# Altium PCB OFS-BOARD.PcbDoc (part 1 of 2)
Units mm, origin at the board's own origin, x right, y up, seen from the top; angles counter-clockwise.
Board outline 131.85 x 70.25 mm, 4 copper layers (Top Layer, Power, GND, Bottom Layer), stack 0.603 mm thick; 110 components, 67 nets, 411 pads, 420 vias.
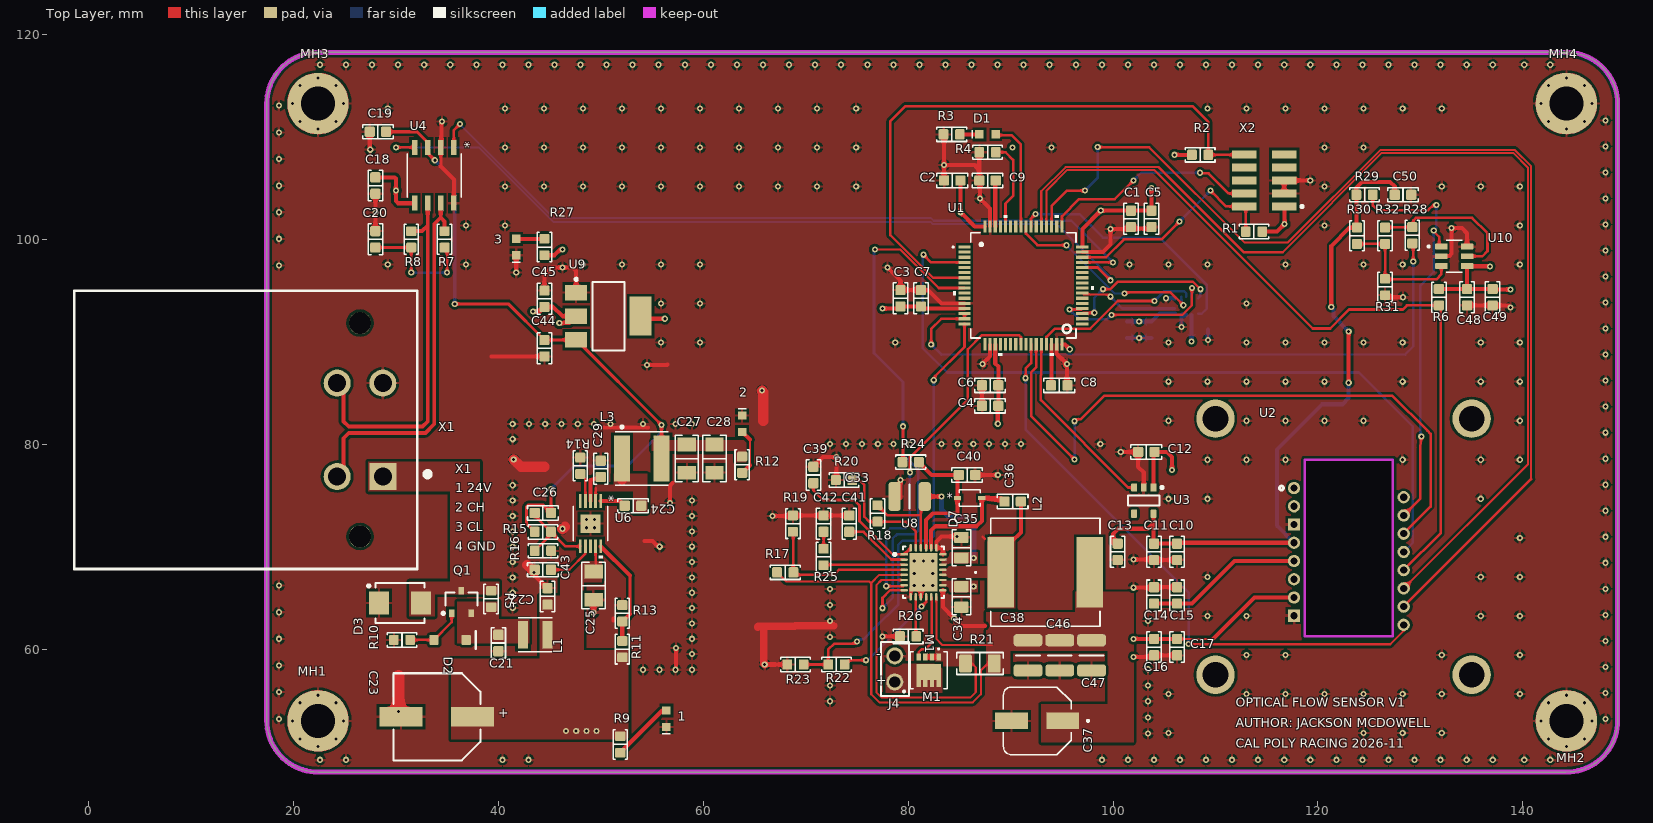
[diagram p0: Top Layer view]
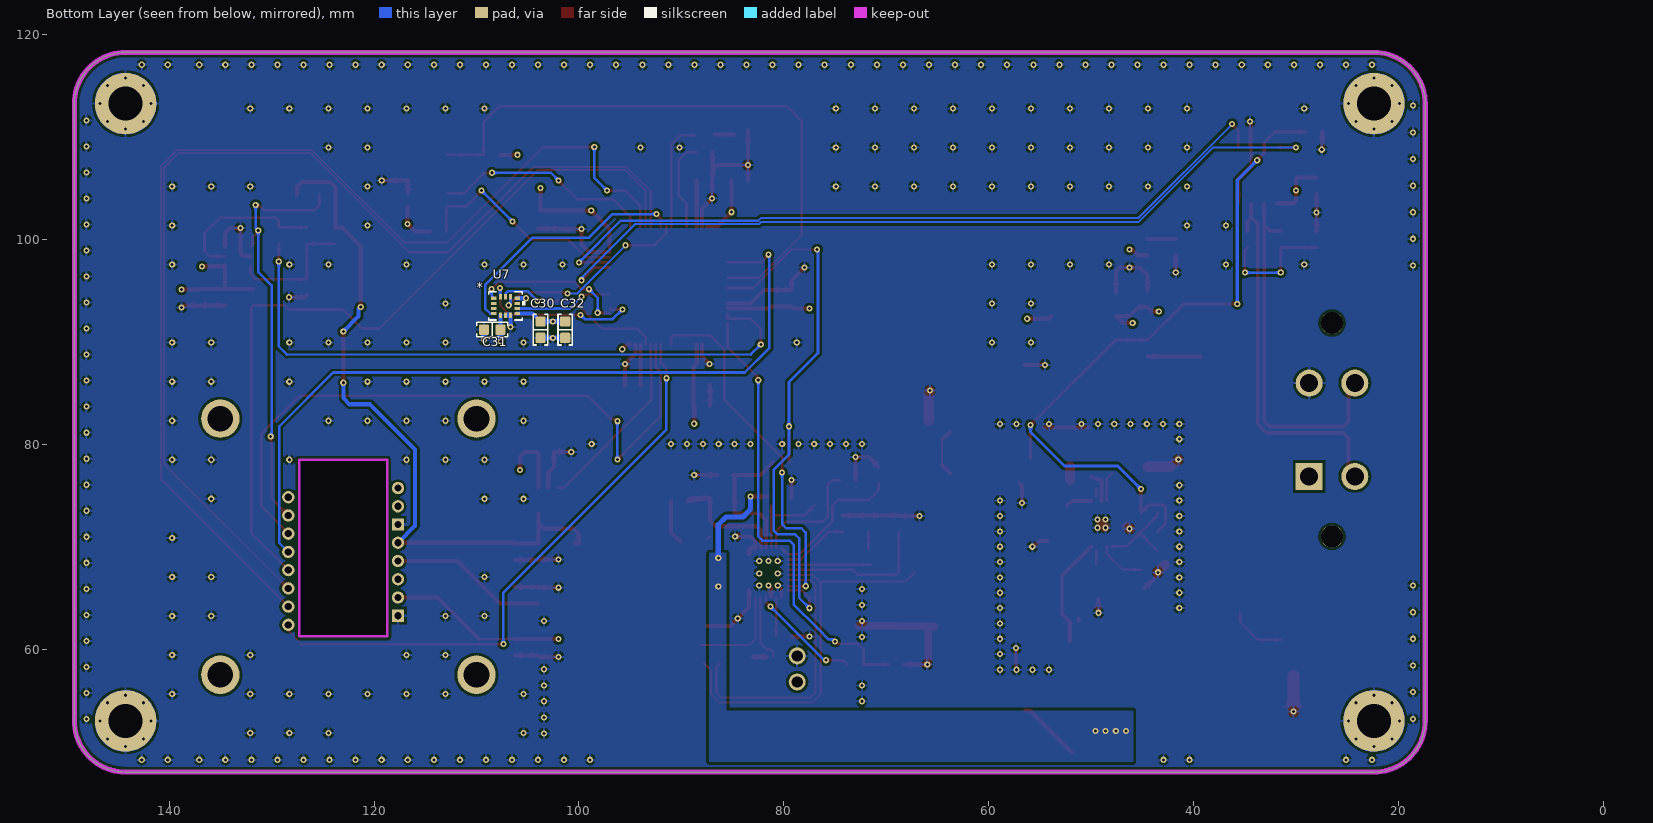
[diagram p1: Bottom Layer view, seen from below]
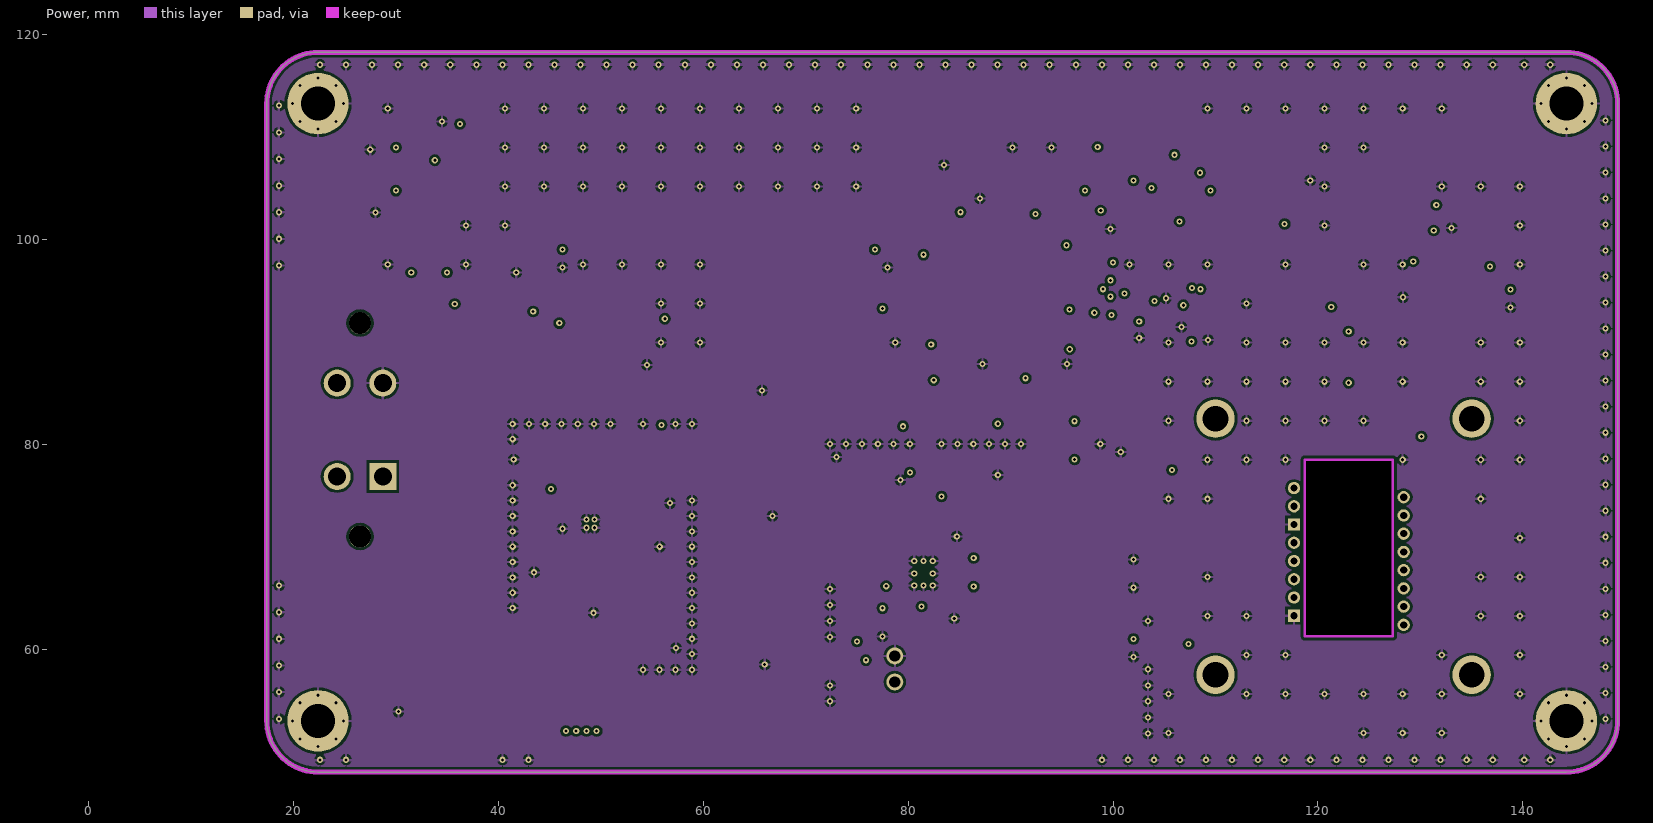
[diagram p2: Power]
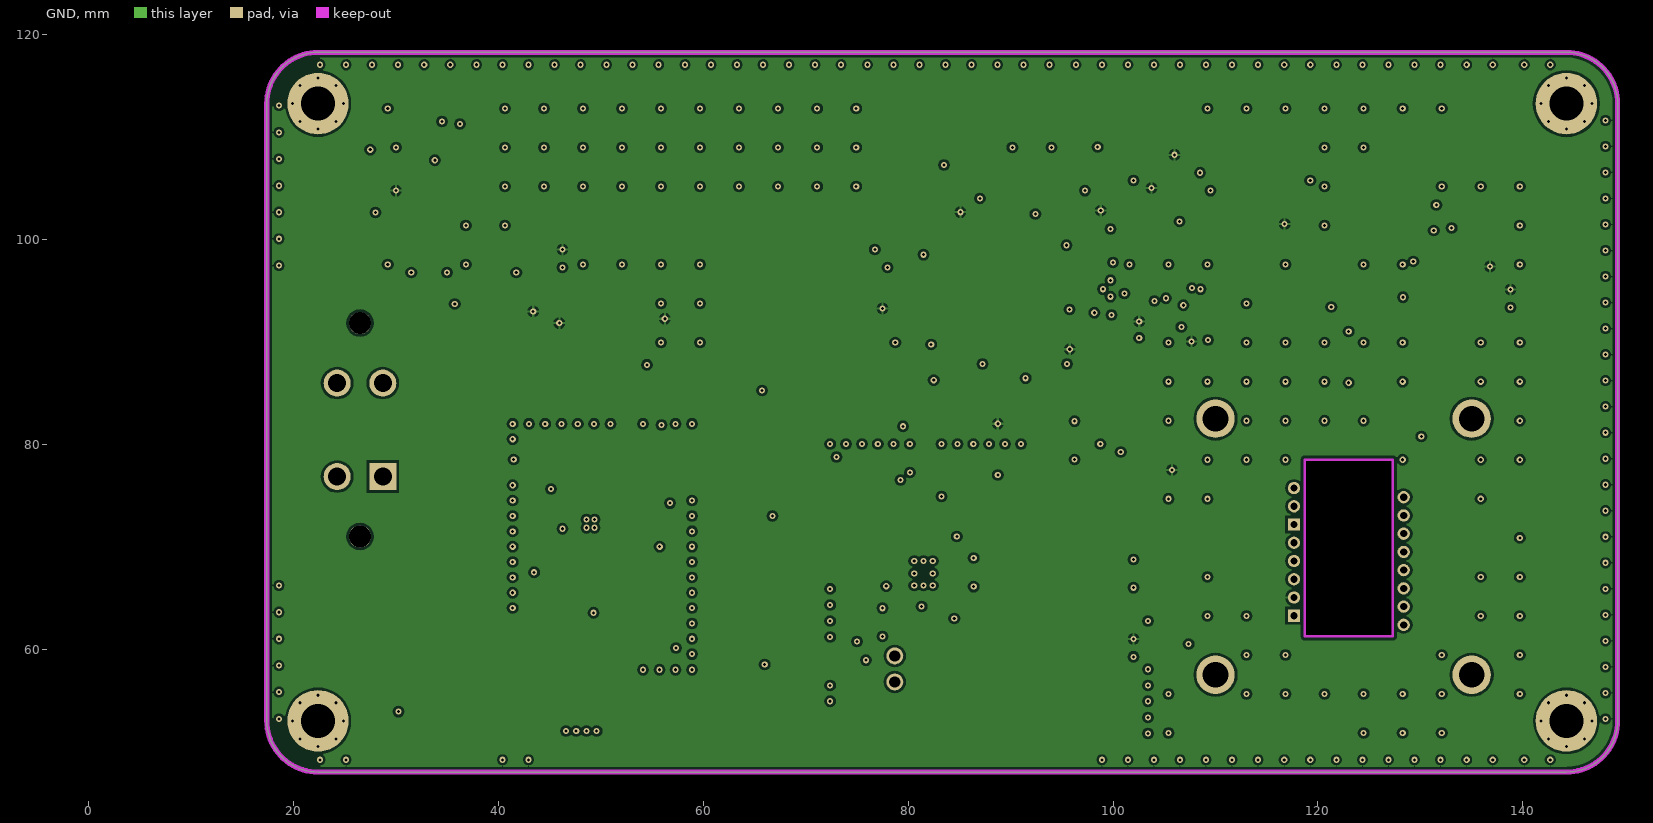
[diagram p3: GND]
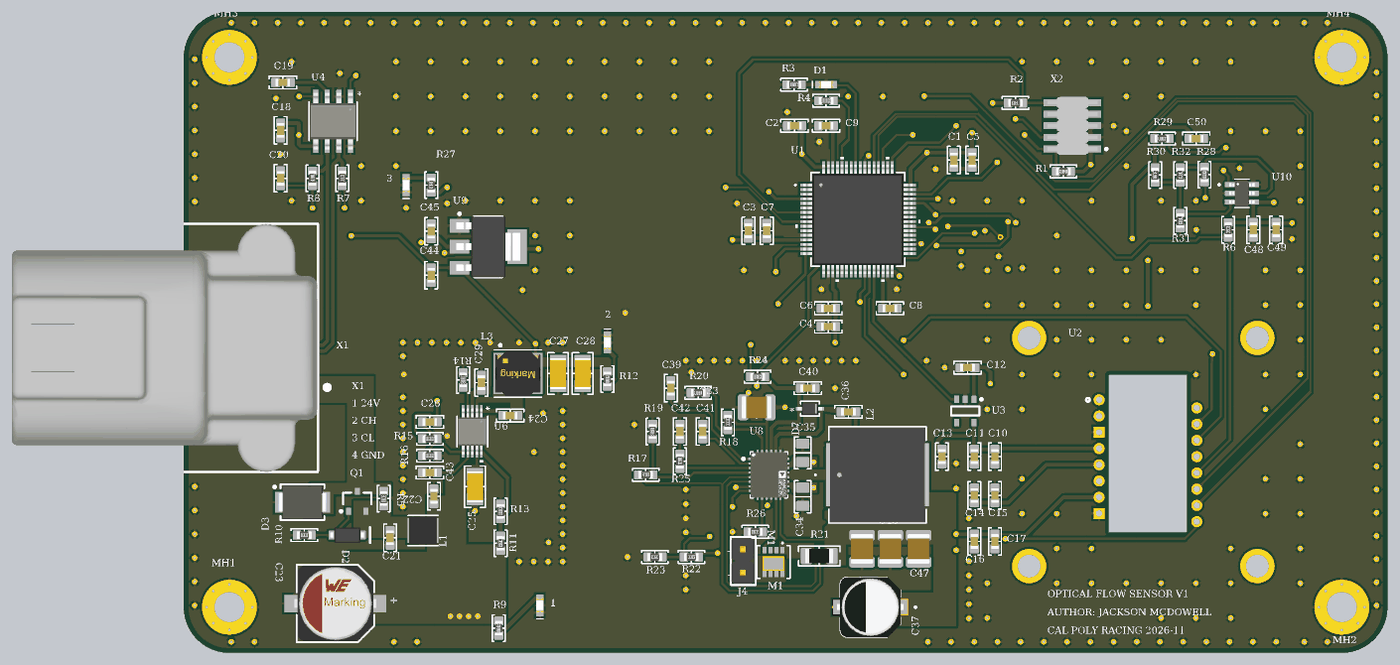
[diagram p4: 3D render of the assembled board from above, using the file's embedded part models]
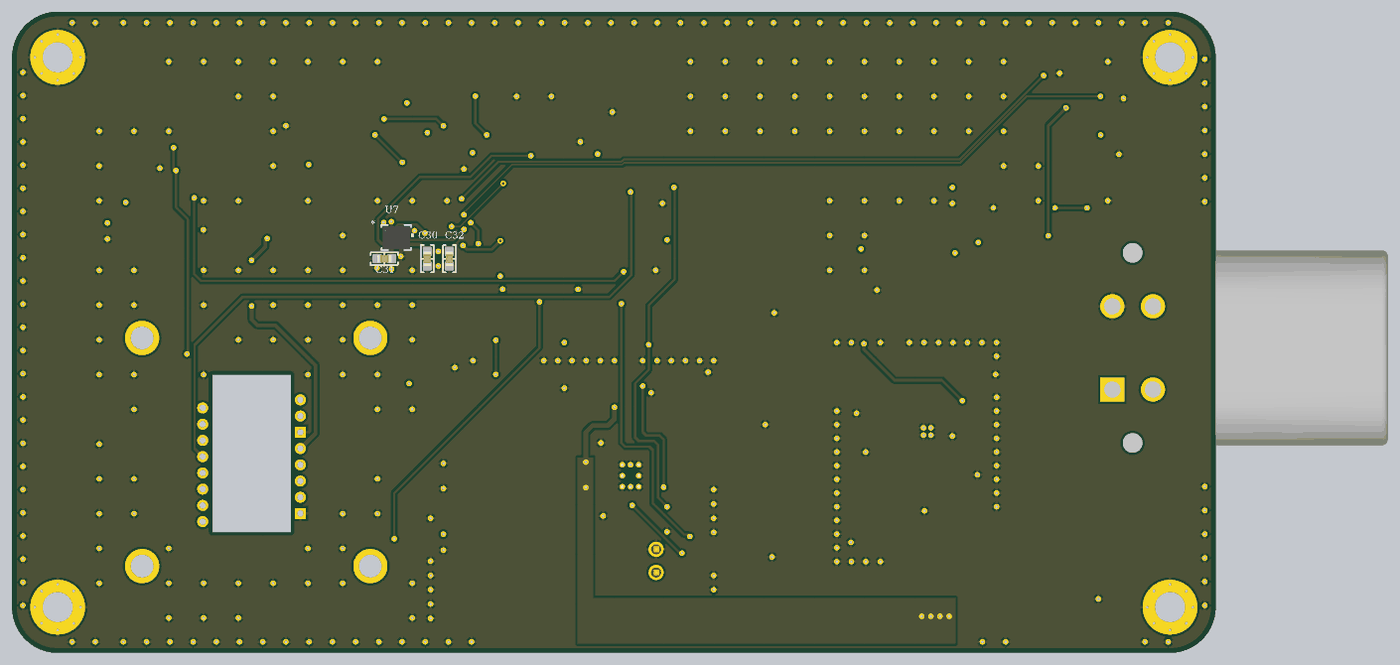
[diagram p5: 3D render of the assembled board from below, using the file's embedded part models]

## Layer stack, top to bottom
Top Solder: solder mask 0.0102, Solder Resist, Dk 3.5
Top Layer: signal copper 0.0356
Dielectric 2: prepreg 0.0711, PP-006, Dk 4.1
Power: signal copper 0.035
Dielectric 1: dielectric 0.32, FR-4, Dk 4.8
GND: signal copper 0.035
Dielectric 3: prepreg 0.0711, PP-006, Dk 4.1
Bottom Layer: signal copper 0.0356
Bottom Solder: solder mask 0.0102, Solder Resist, Dk 3.5

## Board outline
22.4,48 144.25,48 ccw(c144.25,53) 149.25,53 149.25,113.25 ccw(c144.25,113.25) 144.25,118.25 22.4,118.25 ccw(c22.4,113.25) 17.4,113.25 17.4,53 ccw(c22.4,53)
cut-out: 127.3,61.2 118.7,61.2 118.7,78.5 127.3,78.5

## Design rules (kind name [scope] priority, off if disabled: settings)
Clearance PourClearance [InPolygon] p1: gap=0.254 ignorepadtopadclearanceinfootprint=FALSE
Clearance [All] p2: gap=0.1 ignorepadtopadclearanceinfootprint=FALSE
DiffPairsRouting [All] p1: maxlimit=0.254 minlimit=0.254 mostfreqgap=0.254 toplayer_minwidth=0.381 toplayer_maxwidth=0.381 toplayer_prefwidth=0.381 midlayer1_minwidth=0.381 midlayer1_maxwidth=0.381 midlayer1_prefwidth=0.381 midlayer2_minwidth=0.381 midlayer2_maxwidth=0.381 midlayer2_prefwidth=0.381 bottomlayer_minwidth=0.381 bottomlayer_maxwidth=0.381 bottomlayer_prefwidth=0.381 maxuncoupledlength=12.7
HoleSize [All] p1: absolutevalues=TRUE maxlimit=3.5 minlimit=0.025 maxpercent=80.000 minpercent=20.000
PolygonConnect PowerPolyDirect [InNet('24V') Or InNet('24V_HARNESS') Or InNet('24V_Unfiltered') Or InNet('5V') Or InNet('SW') Or InNet('LED_SW') Or InNet('LED_VOUT') Or InNet('LED_ISN') Or InNet('LED_VCC')] p1: connectstyle=Direct reliefconductorwidth=0.254 reliefentries=4 polygonreliefangle="90 Angle" airgapwidth=0.254
PolygonConnect [All] p2: connectstyle=Relief reliefconductorwidth=0.254 reliefentries=4 polygonreliefangle="90 Angle" airgapwidth=0.254
RoutingVias [All] p1: holewidth=0.3 width=0.6 viastyle="Through Hole" minholewidth=0.3 minwidth=0.6 maxholewidth=0.3 maxwidth=0.6
SolderMaskExpansion [All] p1: expansion=0 istentingtop=FALSE
SupplyNets "Schematic Supply Nets_6" [InNet('3V3')] p1: voltage=0.000
SupplyNets "Schematic Supply Nets_5" [InNet('GND')] p2: voltage=0.000
SupplyNets "Schematic Supply Nets_4" [InNet('5V')] p3: voltage=0.000
SupplyNets "Schematic Supply Nets_3" [InNet('LED_VCC')] p4: voltage=0.000
SupplyNets "Schematic Supply Nets_2" [InNet('1.9V')] p5: voltage=0.000
SupplyNets "Schematic Supply Nets_1" [InNet('24V')] p6: voltage=0.000
SupplyNets "Schematic Supply Nets" [InNet('INTVCC_LED')] p7: voltage=0.000
Width 24V [InNetClass('All Nets')] p1: maxlimit=1.15 minlimit=0.1 preferedwidth=1.15 midlayer1_minwidth=0.254 midlayer1_maxwidth=0.254 midlayer1_prefwidth=0.254 midlayer2_minwidth=0.254 midlayer2_maxwidth=0.254 midlayer2_prefwidth=0.254 minimp=50.000000 maximp=50.000000 favimp=50.000000
Width [All] p2: maxlimit=0.254 minlimit=0.254 preferedwidth=0.254
28 further rules are at their usual default settings.

## Classes and differential pairs
component class U_POWER: 1 2 3 C21 C22 C23 C24 C25 C26 C27 C28 C29 C43 C44 C45 D2 D3 L1 L3 Q1 R5 R9 R10 R11 R12 R13 R14 R15 R16 R27 U6 U9
component class U_OFS: C10 C11 C12 C13 C14 C15 C16 C17 C48 C49 C50 R6 R28 R29 R30 R31 R32 U2 U3 U10
component class U_MCU: C1 C2 C3 C4 C5 C6 C7 C8 C9 D1 R1 R2 R3 R4 U1 X2
component class U_LED-DRIVER: C33 C34 C35 C36 C37 C38 C39 C40 C41 C42 C46 C47 D7 J4 L2 M1 R17 R18 R19 R20 R21 R22 R23 R24 R25 R26 U8
component class U_IMU: C30 C31 C32 U7
component class U_CAN_TRANSCEIVER: C18 C19 C20 R7 R8 U4
component class TOP-LEVEL: MH1 MH2 MH3 MH4 X1
differential pair CRIT_CAN: +CRIT_CAN_H -CRIT_CAN_L

## Components (designator, comment, footprint, x,y, rotation, side; value= is the part's Value field where it differs from the comment)
1 "0603_LED" 0603_LED 56.4,53.2 r90 top
2 "0603_LED" 0603_LED 63.8,82 r270 top
3 "0603_LED" 0603_LED 41.75,99.25 r90 top
C1 "Capacitor" 0603_CAP 101.75,102 r270 top value=4.7u
C2 "Capacitor" 0603_CAP 84.3,105.75 r180 top value=100n
C3 "Capacitor" 0603_CAP 79.25,94.25 r90 top value=100n
C4 "Capacitor" 0603_CAP 88,83.75 r180 top value=100n
C5 "Capacitor" 0603_CAP 103.75,102 r270 top value=100n
C6 "Capacitor" 0603_CAP 88,85.75 r180 top value=100n
C7 "Capacitor" 0603_CAP 81.25,94.25 r90 top value=100n
C8 "Capacitor" 0603_CAP 94.75,85.75 r0 top value=2.2u
C9 "Capacitor" 0603_CAP 87.75,105.75 r180 top value=2.2u
C10 "Capacitor" 0603_CAP 106.25,69.5 r90 top value=100n
C11 "Capacitor" 0603_CAP 104,69.5 r90 top value=10u
C12 "Capacitor" 0603_CAP 103.25,79.25 r0 top value=1u
C13 "Capacitor" 0603_CAP 100.45,69.5 r90 top value=1u
C14 "Capacitor" 0603_CAP 104,65.25 r270 top value=4.7u
C15 "Capacitor" 0603_CAP 106.25,65.25 r270 top value=100n
C16 "Capacitor" 0603_CAP 104,60.2 r90 top value=10u
C17 "Capacitor" 0603_CAP 106.25,60.2 r90 top value=100n
C18 "Capacitor" 0603_CAP 28,105.25 r90 top value=100n
C19 "Capacitor" 0603_CAP 28.25,110.5 r0 top value=100n
C20 "Capacitor" 0603_CAP 28,100 r90 top value=4.7n
C21 "Capacitor" 0603_CAP 40,60.6 r90 top value=10u
C22 "Capacitor" 0603_CAP 44.8,65.15 r270 top value=10u
C23 "100u" WCAP-PSHP_D8H8.7 34,53.4 r0 top
C24 "Capacitor" 0603_CAP 53.15,74 r180 top value=100n
C25 "GRM319R61H475KA12D" 1206_CAP 49.3,66.2 r90 top
C26 "Capacitor" 0603_CAP 44.35,73.3 r0 top value=10p
C27 "GRM319R61C226KE15D" 1206_CAP 58.4,78.6 r90 top
C28 "GRM319R61C226KE15D" 1206_CAP 61.1,78.6 r90 top
C29 "Capacitor" 0603_CAP 50,77.6 r270 top value=1u
C30 "Capacitor" 0603_CAP 103.759,91.186 r90 bottom value=100nF
C31 "Capacitor" 0603_CAP 108.466,91.186 r180 bottom value=10nF
C32 "Capacitor" 0603_CAP 101.346,91.186 r90 bottom value=2.2uF
C33 "Capacitor" 1210_CAP 80.15,74.9 r180 top value=10µF
C34 "Capacitor" 0805_CAP 85.19,65.1 r270 top value=1µF
C35 "Capacitor" 0805_CAP 85.19,69.9 r90 top value=1µF
C36 "Capacitor" 0603_CAP 90.2,74.4 r0 top value=22nF
C37 "Capacitor" CAP_EEH-ZC1E101XP 92.6,53 r180 top value=100µF
C38 "Capacitor" 1210_CAP 91.7,59.4 r270 top value=4.7µF
C39 "Capacitor" 0603_CAP 70.75,77 r90 top value=2.2µF
C40 "Capacitor" 0603_CAP 85.75,77 r0 top value=2.2µF
C41 "Capacitor" 0603_CAP 74.25,72.25 r90 top value=100nF
C42 "Capacitor" 0603_CAP 71.75,72.25 r90 top value=10nF
C43 "Capacitor" 0603_CAP 44.35,67.75 r0 top value=1n
C44 "Capacitor" 0603_CAP 44.5,89.375 r90 top value=10u
C45 "Capacitor" 0603_CAP 44.5,94.2 r270 top value=22u
C46 "Capacitor" 1210_CAP 94.8,59.4 r270 top value=XµF
C47 "Capacitor" 1210_CAP 97.9,59.4 r270 top value=XµF
C48 "Capacitor" 0603_CAP 134.55,94.35 r90 top value=100n
C49 "Capacitor" 0603_CAP 137.05,94.35 r90 top value=2.2u
C50 "Capacitor" 0603_CAP 128.3,104.35 r180 top value=100n
D1 "0603_LED" 0603_LED 87.75,110.25 r0 top
D2 "MMSZ5231B-7-F" SOD-123 35.3,60.9 r180 top
D3 "SMBJ26CA" SMBJ26CA 30.4,64.5 r0 top
D7 "BAT46WJ,115" SC-90_SOD323F_NEX 86,74.75 r0 top
J4 "1x2PinHeader" 1x2PinHeader 78.7,58.07 r90 top
L1 "100uH" WE-LQS_3015 43.6,61.4 r0 top
L2 "Inductor" IND_SRP1038WA-6R8M_BRN 93.39,67.5 r0 top value=12µH
L3 "74404054150" 74404054150 54,78.6 r180 top
M1 "DMP3045LFVWQ-7" PowerDI3333-8_PMOS 82,57.95 r270 top
MH1 "MOUNTING_HOLE" MOUNTING_HOLE 22.4,53 r0 top
MH2 "MOUNTING_HOLE" MOUNTING_HOLE 144.25,53 r0 top
MH3 "MOUNTING_HOLE" MOUNTING_HOLE 22.4,113.25 r0 top
MH4 "MOUNTING_HOLE" MOUNTING_HOLE 144.25,113.25 r0 top
Q1 "GSFC0403" SSM3J351R,LF 36.4,64.6 r90 top
R1 "Resistor" 0603_RES 113.75,100.75 r180 top value=10k
R2 "Resistor" 0603_RES 108.5,108.25 r180 top value=10k
R3 "Resistor" 0603_RES 84.25,110.25 r0 top value=1k
R4 "Resistor" 0603_RES 87.75,108.5 r0 top value=10k
R5 "Resistor" 0603_RES 39.3,64.9 r90 top value=DNP
R6 "Resistor" 0603_RES 131.8,94.35 r90 top value=10k
R7 "Resistor" 0603_RES 34.75,100 r90 top value=62
R8 "Resistor" 0603_RES 31.5,100 r270 top value=62
R9 "Resistor" 0603_RES 51.9,50.7 r90 top value=16k
R10 "Resistor" 0603_RES 30.6,60.9 r0 top value=100k
R11 "Resistor" 0603_RES 52.1,60 r270 top value=140K
R12 "Resistor" 0603_RES 63.8,78 r90 top value=2.4k
R13 "Resistor" 0603_RES 52.1,63.5 r270 top value=10K
R14 "Resistor" 0603_RES 48,77.9 r270 top value=86.6k
R15 "Resistor" 0603_RES 44.35,71.45 r0 top value=1M
R16 "Resistor" 0603_RES 44.35,69.6 r0 top value=187k
R17 "Resistor" 0603_RES 68,67.5 r180 top value=150k
R18 "Resistor" 0603_RES 77,73.25 r90 top value=274K
R19 "Resistor" 0603_RES 68.75,72.25 r270 top value=10k
R20 "Resistor" 0603_RES 73.75,76.5 r180 top value=29.4k
R21 "Resistor" 1206_RES 87,58.6 r0 top value=60mΩ
R22 "Resistor" 0603_RES 73,58.5 r0 top value="33 Ω"
R23 "Resistor" 0603_RES 69,58.5 r180 top value=100k
R24 "Resistor" 0603_RES 80.25,78.25 r0 top value=100K
R25 "Resistor" 0603_RES 71.75,69 r270 top value=162k
R26 "Resistor" 0603_RES 80,61.25 r0 top value=45.3k
R27 "Resistor" 0603_RES 44.5,99.25 r270 top value=820
R28 "Resistor" 0603_RES 129.207,100.4 r90 top value=33Ω
R29 "Resistor" 0603_RES 124.55,104.35 r0 top value=1k
R30 "Resistor" 0603_RES 123.8,100.35 r90 top value=10k
R31 "Resistor" 0603_RES 126.55,95.35 r270 top value=53.6k
R32 "Resistor" 0603_RES 126.55,100.35 r270 top value=560k
U1 "STM32H573RIT6" LQFP64-10x10mm_STM 91.25,95.5 r0 top
U2 "PAW3395DM-T6QU" PAW3395DM-T6QU 123,69.5 r0 top
U3 "TLV70019DDCR" DDC0005A_L 103,74.5 r270 top
U4 "TCAN1057AVDRQ1" SOIC8_D_TEX 33.75,106.25 r270 top
U6 "LT8609AHMSE#TRPBF" 05-08-1664_ADI 49,72.25 r270 top
U7 "ICM-42688-P" LGA14_2P5X3X0P91_TDK 107.165,93.5 r180 bottom
U8 "LT3932EUFD-1#PBF" FP-UFD-28-05-08-1712-IPC_C 81.5,67.5 r0 top
U9 "AZ1117CH-3.3TRG1" SOT-233-4 50.75,92.5 r0 top
U10 "TLV3501AIDBVR" SOT95P280X145-6N 133.3,98.35 r0 top
X1 "DTF13-4P" DTF13-4P 26.5,81.41 r270 top
X2 "20021121-00010C4LF" HDR2X5_SMT 114.75,105.75 r90 top

## Footprints (in the part's own frame and the unit in brackets; to place one, negate y for a bottom-side part, rotate by r counter-clockwise, add the part's x,y. Pads: shape width x height; smd on the part's side, far side on the other; paste and mask are expansions set on the pad)
1x2PinHeader [mm]
  round 1.65 hole 1.1 mask+0: 1(-1.27,0) 2(1.27,0)
  silkscreen extent -2.64,-1.37 2.64,1.37, body extent -2.54,-1.22 2.54,1.32, height 8.77
05-08-1664_ADI [mil]
  rect 52.5x11 smd paste+0 mask+0: 1(-87.25,39.37) 2(-87.25,19.68) 3(-87.25,0) 4(-87.25,-19.69) 5(-87.25,-39.37) 6(87.25,-39.37) 7(87.25,-19.69) 8(87.25,0) 9(87.25,19.68) 10(87.25,39.37)
  rect 70x78 smd paste+0 mask+0: 11(0,0)
  silkscreen extent -66,-66 134,66, body extent -99,-61 99,61, height 43
0603_CAP [mm]
  rrect25% 1x1 smd: 1(-0.8,0) 2(0.8,0)
  silkscreen extent -1.5,-0.7 1.5,0.7, body extent -0.8,-0.41 0.8,0.41, height 0.82
0603_LED [mm] "SMD Mono-color Chip LED, body 1.60 x 0.80 mm"
  rect 0.8x0.8 smd: 1(-0.8,0) 2(0.8,0)
  silkscreen extent -1.55,-0.4 -1.4,0.4, body extent -0.8,-0.4 0.8,0.4, height 0.7
0603_RES [mm] "Chip Resistor, 2-Leads, Body 1.60x0.80mm, IPC Medium Density"
  rrect25% 0.95x1 smd: 1(-0.8,0) 2(0.8,0)
  silkscreen extent -1.45,-0.7 1.45,0.7, body extent -0.8,-0.4 0.8,0.4, height 0.45
0805_CAP [mm] "Chip Capacitor, Body 3.2x1.6mm, Height 1.9mm, IPC Low Density"
  rrect25% 1.1x1.45 smd: 1(-1,0) 2(1,0)
  silkscreen extent -1.75,-0.9 1.75,0.9, body extent -1.1,-0.65 1.1,0.65, height 1.1
1206_CAP [mm]
  rect 1.35x1.8 smd: 1(-1.375,0) 2(1.375,0)
  silkscreen extent -2.27,-1.12 2.27,1.15, body extent -1.7,-0.87 1.7,0.87, height 0.95
1206_RES [mm]
  rrect25% 1.25x1.75 smd: 1(-1.4,0) 2(1.4,0)
  silkscreen extent -2.27,-1.07 2.27,1.07, body extent -1.55,-0.77 1.55,0.78, height 0.55
1210_CAP [mm]
  rrect50% 1.18x2.82 smd: 1(-1.47,0) 2(1.47,0)
  silkscreen extent 0,-1.15 0,1.15, body extent -1.65,-1.25 1.65,1.25, height 0.94
74404054150 [mm] "SMD Power Inductor, 2-Leads, body 5x5mm"
  rect 1.55x4.5 smd: 1(1.925,0) 2(-1.925,0)
  silkscreen extent -2.6,-3.22 2.6,2.6, body extent -2.5,-2.5 2.5,2.5, height 4.03
CAP_EEH-ZC1E101XP [mm]
  rect 3.2x1.6 smd paste+0 mask+0.102: 1(-2.5,0) 2(2.5,0)
  silkscreen extent -5.05,-3.3 3.3,3.3, body extent -3.65,-3.3 3.65,3.3, height 7.7
DDC0005A_L [mm] "SOT23, 5-Leads, Body 3.05x1.75mm, Pitch 0.95mm, IPC High Density"
  rrect18% 0.8x0.55 smd: 1(-1.275,0.95) 2(-1.275,0) 3(-1.275,-0.95) 4(1.275,-0.95) 5(1.275,0.95)
  silkscreen extent -1.4,-1.55 0.5,1.9, body extent -0.88,-1.52 0.87,1.53, height 1.1
DTF13-4P [mm]
  rect 2.64x2.64 hole 1.76: 1(4.561,2.223)
  round 2.64 hole 1.76: 2(4.561,-2.227) 3(-4.559,-2.227) 4(-4.559,2.223)
  round 2.16 hole 2.16 unplated: None(-10.415,0) None(10.415,0)
  silkscreen extent -13.59,-27.88 13.59,6.85, body extent -13.59,-27.94 13.59,5.52, height 23.53
FP-UFD-28-05-08-1712-IPC_C [mm]
  rect 0.731x0.242 smd paste+0 mask+0: 1(-1.891,1.75)
  rrect100% 0.731x0.242 smd paste+0 mask+0: 2(-1.891,1.25) 3(-1.891,0.75) 4(-1.891,0.25) 5(-1.891,-0.25) 6(-1.891,-0.75) 7(-1.891,-1.25) 8(-1.891,-1.75) 15(1.891,-1.75) 16(1.891,-1.25) 17(1.891,-0.75) 18(1.891,-0.25) 19(1.891,0.25) 20(1.891,0.75) 21(1.891,1.25) 22(1.891,1.75)
  rrect100% 0.242x0.731 smd paste+0 mask+0: 9(-1.25,-2.391) 10(-0.75,-2.391) 11(-0.25,-2.391) 12(0.25,-2.391) 13(0.75,-2.391) 14(1.25,-2.391) 23(1.25,2.391) 24(0.75,2.391) 25(0.25,2.391) 26(-0.25,2.391) 27(-0.75,2.391) 28(-1.25,2.391)
  rect 2.75x3.75 smd paste-1000 mask+0: 29(0,0)
  silkscreen extent -2.93,-2.5 2,2.5, body extent -2.36,-2.86 2.36,2.86, height 0.25
HDR2X5_SMT [mm] "Header, 10-Leads, Body 3.43x6.35mm, Pitch 1.27mm"
  rect 0.76x2.4 smd: 1(-2.54,-1.95) 2(-2.54,1.95) 3(-1.27,-1.95) 4(-1.27,1.95) 5(0,-1.95) 6(0,1.95) 7(1.27,-1.95) 8(1.27,1.95) 9(2.54,-1.95) 10(2.54,1.95)
  silkscreen extent -2.66,-3.83 -2.42,-3.58, body extent -3.17,-2.75 3.18,2.75, height 4.5
IND_SRP1038WA-6R8M_BRN [mil]
  rect 103x272 smd paste+0 mask+0: 1(-171,0) 2(171,0)
  silkscreen extent -271,-208 210,208, body extent -222,-203 222,203, height 158
LGA14_2P5X3X0P91_TDK [mil]
  rect 21x12 smd paste+0 mask+0: 1(-44.5,29.53) 2(-44.5,9.84) 3(-44.5,-9.84) 4(-44.5,-29.53) 8(44.5,-29.53) 9(44.5,-9.84) 10(44.5,9.84) 11(44.5,29.53)
  rect 12x21 smd paste+0 mask+0: 5(-19.68,-35) 6(0,-35) 7(19.69,-35) 12(19.69,35) 13(0,35) 14(-19.68,35)
  silkscreen extent -64,-54 75,54, body extent -59,-49 59,49, height 38
LQFP64-10x10mm_STM [mm]
  rect 1.194x0.305 smd paste+0 mask+0: 1(-5.75,3.75) 2(-5.75,3.25) 3(-5.75,2.75) 4(-5.75,2.25) 5(-5.75,1.75) 6(-5.75,1.25) 7(-5.75,0.75) 8(-5.75,0.25) 9(-5.75,-0.25) 10(-5.75,-0.75) 11(-5.75,-1.25) 12(-5.75,-1.75) 13(-5.75,-2.25) 14(-5.75,-2.75) 15(-5.75,-3.25) 16(-5.75,-3.75) 33(5.75,-3.75) 34(5.75,-3.25) 35(5.75,-2.75) 36(5.75,-2.25) 37(5.75,-1.75) 38(5.75,-1.25) 39(5.75,-0.75) 40(5.75,-0.25) 41(5.75,0.25) 42(5.75,0.75) 43(5.75,1.25) 44(5.75,1.75) 45(5.75,2.25) 46(5.75,2.75) 47(5.75,3.25) 48(5.75,3.75)
  rect 0.305x1.194 smd paste+0 mask+0: 17(-3.75,-5.75) 18(-3.25,-5.75) 19(-2.75,-5.75) 20(-2.25,-5.75) 21(-1.75,-5.75) 22(-1.25,-5.75) 23(-0.75,-5.75) 24(-0.25,-5.75) 25(0.25,-5.75) 26(0.75,-5.75) 27(1.25,-5.75) 28(1.75,-5.75) 29(2.25,-5.75) 30(2.75,-5.75) 31(3.25,-5.75) 32(3.75,-5.75) 49(3.75,5.75) 50(3.25,5.75) 51(2.75,5.75) 52(2.25,5.75) 53(1.75,5.75) 54(1.25,5.75) 55(0.75,5.75) 56(0.25,5.75) 57(-0.25,5.75) 58(-0.75,5.75) 59(-1.25,5.75) 60(-1.75,5.75) 61(-2.25,5.75) 62(-2.75,5.75) 63(-3.25,5.75) 64(-3.75,5.75)
  silkscreen extent -6.93,-6.85 6.85,6.85, body extent -6,-6 6,6, height 1.6
MOUNTING_HOLE [mm] "Mounting Hole for 4-40 Bolt2"
  round 0.6 hole 0.3: 1(-2.5,0) 1(-1.768,-1.768) 1(-1.768,1.768) 1(0,-2.5) 1(0,2.5) 1(1.768,-1.768) 1(1.768,1.768) 1(2.5,0)
  round 6 hole 3.3 unplated: 1(0,0)
  Top Layer circle w1: c0,0 r2.5
  Bottom Layer circle w1: c0,0 r2.5
PAW3395DM-T6QU [mm] "PixArt PAW3395DM-T6QU optical navigation sensor, 16-pin molded lead-frame DIP, 1.78mm pitch staggered dual row, 10.7mm row spacing, through-hole"
  round 1.2 hole 0.7: 1(-5.334,6.223) 2(-5.334,4.443) 4(-5.334,0.883) 5(-5.334,-0.897) 6(-5.334,-2.677) 7(-5.334,-4.457) 9(5.366,-7.127) 10(5.366,-5.347) 11(5.366,-3.567) 12(5.366,-1.787) 13(5.366,-0.007) 14(5.366,1.773) 15(5.366,3.553) 16(5.366,5.333)
  rect 1.2x1.2 hole 0.7: 3(-5.334,2.663) 8(-5.334,-6.237)
  Keep-Out Layer lines w0.254: -4.284,-8.257 4.316,-8.257 4.316,9.003 -4.284,9.003 -4.284,-8.257
  silkscreen extent -6.76,6.02 -6.36,6.42
PowerDI3333-8_PMOS [mm]
  rect 0.7x0.42 smd paste+0 mask+0: 1(-1.3,0.975) 1(-1.3,-0.325) 1(-1.3,0.325) 4(-1.3,-0.975) 5(1.3,0.975) 5(1.3,-0.325) 5(1.3,0.325) 5(1.3,-0.975)
  rect 1.549x2.37 smd paste-0.127 mask+0: 5(0.175,0)
  silkscreen extent -2.15,-1.8 1.8,1.8
SC-90_SOD323F_NEX [mil]
  rect 27.87x16 smd paste+0 mask+0: 1(-46.94,0) 2(46.94,0)
  silkscreen extent -40,-32 40,32, body extent -53,-26 53,26, height 32
SMBJ26CA [mm] "SODFL, 2-Leads, Body 3.62x5.40mm, IPC Medium Density"
  rect 1.95x2.25 smd: 1(-2.05,0) 2(2.05,0)
  silkscreen extent -3.17,-1.95 2.4,1.95, body extent -2.67,-1.81 2.67,1.81, height 2.65
SOD-123 [mm] "SODFL, 2-Leads, Body 1.55x3.70mm, IPC Medium Density"
  rrect15% 0.9x0.95 smd: 1(-1.575,0) 2(1.575,0)
  silkscreen extent -2.5,-0.85 -2.5,0.85, body extent -1.85,-0.85 1.85,0.85, height 1.35
SOIC8_D_TEX [mil]
  rect 57.5x22 smd paste+0 mask+0: 1(-107.25,75) 2(-107.25,25) 3(-107.25,-25) 4(-107.25,-75) 5(107.25,-75) 6(107.25,-25) 7(107.25,25) 8(107.25,75)
  silkscreen extent -84,-104 84,104, body extent -122,-99 122,99, height 69
SOT95P280X145-6N [mm]
  rrect25% 1.21x0.58 smd: 1(-1.255,0.95) 2(-1.255,0) 3(-1.255,-0.95) 4(1.255,-0.95) 5(1.255,0) 6(1.255,0.95)
  silkscreen extent -2.6,-1.56 0.8,1.56, body extent -1.4,-1.45 1.4,1.45, height 1.45
SOT-233-4 [mm] "SOT223, 4-Leads, Body 6.50x7.00mm (avg), Pitch 2.30mm, IPC Medium Density"
  rect 2.15x1.5 smd: 1(-3.15,2.3) 2(-3.15,0) 3(-3.15,-2.3)
  rect 2.15x3.8 smd: 4(3.15,0)
  silkscreen extent -3.27,-3.35 1.55,3.72, body extent -3.5,-3.35 3.5,3.35, height 1.8
SSM3J351R,LF [mm]
  rect 0.75x0.55 smd: 1(-1.1,0.95) 2(-1.1,-0.95) 3(1.1,0)
  silkscreen extent -1.22,-1.55 0.95,1.9, body extent -0.95,-1.55 0.95,1.55, height 0.81
WCAP-PSHP_D8H8.7 [mm] "Aluminium Polymer V-Chip SMT Capacitors, D8mm x L8.7mm"
  rect 4.2x1.9 smd: 1(3.5,0) 2(-3.5,0)
  silkscreen extent -4.25,-4.25 4.25,4.25, body extent -4.5,-4.15 4.5,4.15, height 8.7
WE-LQS_3015 [mm] "SMD Power Inductor, 2-Leads, body 3x3mm"
  rect 1x2.7 smd: 1(-1.2,0) 2(1.2,0)
  silkscreen extent -1.66,-1.66 1.66,1.66, body extent -1.5,-1.5 1.5,1.5, height 1.5

## Part data
1 2 3 D1: "WL-SMCW Mono-color Chip LED Waterclear, SMT, size 0603, Blue, 3.2V, 140°", Case/Size Code=0603, Emitting Color=Blue, Forward Voltage=3.2V, Manufacturer="Wurth Elektronik", Manufacturer Part Number=150060BS75000, Operating Temperature Max=85°C, Operating Temperature Min=-40°C, Category="Signal LEDs", Chip Technology=InGaN, ComponentLink1Description="Website Link", ComponentLink1URL=https://www.we-online.com/redexpert/article/150060BS75000?ad, ComponentLink2Description="Datasheet Link", ComponentLink2URL=https://www.we-online.com/redexpert/spec/150060BS75000?ad, Dominant Wavelength=470nm, Height=0.7mm, Length=1.6mm, Luminous Intensity=145mcd, Match Code=WL-SMCW, Mount="Surface Mount", Packaging="Tape and Reel", Peak Wavelength=465nm, Viewing Angle=140°, Width=0.8mm
C1 C2 C3 C4 C5 C6 C7 C8 C9 C18 C19 C20 C24 C26 C29 C43 C44 C45: Voltage=16V
C21 C22: Voltage=50V
C23: library part 875115652007, "Cap, 100uf, 35V, Alu Elec Smd, Polymer Rohs Compliant Wurth Elektronik 875115652007", Capacitance=100µF, ESR (Equivalent Series Resistance)=30mΩ, Leakage Current=700µA, Max Operating Temperature=105°C, Min Operating Temperature=-55°C, Ripple Current=3A, Voltage Rating=35V, ComponentLink1Description=Digikey, ComponentLink1URL=https://www.digikey.com/en/products/detail/würth-elektronik/875115652007/8556615, Diameter=8mm, Length=8.7mm, Pitch=3.1mm, RoHS=Compliant, Width=8.3mm
C25: "CAP CER 4.7UF 50V X5R 1206", Voltage=50V, ComponentLink1Description=Digikey, ComponentLink1URL=https://www.digikey.com/en/products/detail/murata-electronics/GRM319R61H475KA12D/6606013, Vaule=4.7u
C27 C28: "CAP CER 22UF 16V X5R 1206", Voltage=16V, ComponentLink1Description=Digikey, ComponentLink1URL=https://www.digikey.com/en/products/detail/murata-electronics/GRM319R61C226KE15D/8323879, Vaule=22u
D2: "Zener Diode 5.1V 500mW ±5% Surface Mount SOD-123", Package=SOD-123, ComponentLink1Description=Digikey, ComponentLink1URL=https://www.digikey.com/en/products/detail/diodes-incorporated/MMSZ5231B-7-F/755472, Num_Circuits=1
D3: "42.1V Clamp 14.3A Ipp Tvs Diode Surface Mount DO-214AA (SMBJ)", ComponentLink1Description=Digikey, ComponentLink1URL=https://www.digikey.com/en/products/detail/littelfuse-inc/SMBJ26CA/286000
D7: library part "Schottky Diode", "Schottky Diode", AF=1, BV=0, BV_MAX=1e99, CJO=0, CJP=0, CTA=0, CTP=0, EG=1.11, FC=0.5, FCS=0.5, FV_MAX=1e99, IBV=0.001, IKF=0, IKR=0, IS=1e-14, ISR=1e-14, JSW=0, JTUN=0, JTUNSW=0, KEG=1, KF=0, LEVEL=1, MJSW=0.33, N=1, NBV=1, NR=1, NS=1, NTUN=30, PHP=1, RS=0, SimulationGenericComponent=True, TCV=0, TLEV=0, TLEVC=0, TM1=0, TM2=0, TNOM=27, TPB=0, TPHP=0, TRS=0, TRS2=0, TT=0, TTT1=0, TTT2=0, VJ=1, XTI=3, XTITUN=3
L1: library part 74404032101, "WE-LQS SMT Power Inductor, size 3015, 100μH, 1.9Ω", Case/Size Code=3015, DC Resistance=1.9Ω, Inductance=100μH, Manufacturer="Wurth Elektronik", Max Operating Temperature=125°C, Min Operating Temperature=-40°C, Rated Current=0.3A, Saturation Current=0.26A, Self Resonant Frequency=7.5MHz, Category="Power Inductors", ComponentLink1Description="Website Link", ComponentLink1URL=https://www.we-online.com/redexpert/article/74404032101?ad, ComponentLink2Description="Datasheet Link", ComponentLink2URL=https://www.we-online.com/redexpert/spec/74404032101?ad, Height=1.5mm, Length=3mm, Manufacturer Part Number=74404032101, Match Code=WE-LQS, Mount="Surface Mount", Packaging="Tape and Reel", Width=3mm
L3: "Inductor Power Semi-Shielded Wirewound 15uH 20% 100KHz 2A 0.086Ohm DCR 2020 Automotive T/R", Ambient Temperature Range High=85°C, Ambient Temperature Range Low=-40°C, Case/Package=Nonstandard, Current Rating=2A, DC Resistance (DCR)=86mΩ, Inductance=15µH, Inductance Tolerance=20%, Max Operating Temperature=125°C, Saturation Current=2.2A, Self Resonant Frequency=22MHz, Test Frequency=100kHz, ComponentLink1Description=Digikey, ComponentLink1URL=https://www.digikey.com/en/products/detail/würth-elektronik/74404054150/4865666, Composition=Wirewound, Core Material=Ferrite, Height=4mm, Height - Seated (Max)=3.9878mm, Length=5mm, Max DC Current=2A, Min Operating Temperature=-40°C, Mount="Surface Mount", REACH SVHC=Unknown, RMS Current (Irms)=2A, RoHS=Compliant, Shielding=Shielded, Termination=SMD/SMT, Tolerance=20%, Width=5mm
M1: "P-channel MOSFET 30V 5.7A, PowerDI3333-8 (pins 1-3 S, 4 G, 5-8 + pad D)"
Q1: "MOSFET P-CH 40V 2.9A SOT-23F", ComponentLink1Description=Digikey, ComponentLink1URL=https://goodarksemi.com/docs/datasheets/mosfets/GSFC0403.pdf
U1: Mfr_Name=STMicroelectronics, RefDes=RefDes, Type=Type
U2: "PixArt PAW3395DM-T6QU optical navigation sensor, 16-pin molded lead-frame DIP, 1.78mm pitch staggered dual row, 10.7mm row spacing, through-hole"
U3: library part CMP-0394-01054-2, "Single Output LDO, 200 mA, Fixed 1.9 V Output, 2 to 5.5 V Input, with Low IQ, 5-pin SOT (DDC), -40 to 125 degC, Green (RoHS & no Sb/Br)", Manufacturer="Texas Instruments", Accuracy(%)=2, Code_JEDEC=MO-193, ComponentLink1Description="Manufacturer URL", ComponentLink1URL=http://www.ti.com/, ComponentLink2Description=Datasheet, ComponentLink2URL=http://www.ti.com/general/docs/lit/getliterature.tsp?genericPartNumber=TLV70019&fileType=pdf, ComponentLink3Description="Package Specification", ComponentLink3URL=http://www.ti.com/litv/pdf/mpds123d, DatasheetVersion=SLVSA00D, Eco-Plan="Green (RoHS & no Sb/Br)", Fixed Output Options(V)=1.9, Iout(Max)(A)=0.2, Iq(Typ)(mA)=0.03, Mounting Technology="Surface Mount", PackageDescription="5-Pin Plastic Small Outline, Body 2.9 x 1.6 mm, 0.95 mm Pitch", PackageReference=DDC0005A, PackageVersion=4204403-2/E, PartNumber=TLV70019DDCR, SubFamily="Single Channel LDO", Vdo(Typ)(mV)=175, Vin(Max)(V)=5.5, Vin(Min)(V)=2, Vout Adj(Max)(V)=1.9, Vout Adj(Min)(V)=1.9
U4: "CAN transceiver with silent mode 8-SOIC Bus Protected", Manufacturer_Name="Texas Instruments", ComponentLink1Description=Datasheet, ComponentLink1URL=https://www.ti.com/lit/ds/symlink/tcan1057a-q1.pdf, Copyright="Copyright (C) 2025 Ultra Librarian. All rights reserved.", Manufacturer_Part_Number=TCAN1057AVDRQ1, RefDes=RefDes, Type=Interface
U6: library part LT8609AHMSETRPBF, "Buck Switching Regulator IC Positive Adjustable 0.782V 1 Output 3A 10-TFSOP, 10-MSOP (0.118\", 3.00mm Width) Exposed Pad", Manufacturer_Name="Analog Devices Inc", Copyright="Copyright (C) 2025 Ultra Librarian. All rights reserved.", Manufacturer_Part_Number=LT8609AHMSE#TRPBF, RefDes=RefDes, Type="Power Management"
U7: "Description", Manufacturer_Name=TDK, Copyright="Copyright (C) 2025 Ultra Librarian. All rights reserved.", Manufacturer_Part_Number=ICM-42688-P, RefDes=RefDes, Type="Motion Sensors"
U8: library part CMP-09135-000017-1, "40V, 2A MONOLITHIC SYNCHRONOUS S", RoHS Compliant=Yes
U9: "No Description Available", Manufacturer_Name="Diodes Inc", Copyright="Copyright (C) 2025 Ultra Librarian. All rights reserved.", Manufacturer_Part_Number=AZ1117CH-3.3TRG1, RefDes=RefDes, Type=Type
U10: "4.5ns, Rail-to-Rail, High Speed Comparator with Shutdown", Package="SOT-23-6 Texas Instruments", Check_prices=https://www.snapeda.com/parts/TLV3501AIDBVR/Texas+Instruments/view-part/?ref=eda, MF="Texas Instruments", MP=TLV3501AIDBVR, SnapEDA_Link=https://www.snapeda.com/parts/TLV3501AIDBVR/Texas+Instruments/view-part/?ref=snap
X1: library part TE_DTF13-4P, "Connector Header Through Hole, Right Angle 4 position 0.175\" (4.44mm)", ComponentLink1Description=Datasheet, ComponentLink1URL=https://www.te.com/usa-en/product-DTF13-4P.html, ComponentLink2Description=Digikey, ComponentLink2URL=https://www.digikey.com/en/products/detail/te-connectivity-deutsch-connectors/DTF13-4P/7220163
X2: "Header, 10-Leads, Body 3.43x6.35mm, Pitch 1.27mm", Circuits=10, ComponentLink1Description=Digikey, ComponentLink1URL=https://www.digikey.com/product-detail/en/amphenol-icc-fci/20021121-00010C4LF/609-3695-1-ND/2209147, Name=20021121-00010C4LF
C10 C11 C12 C13 C14 C15 C16 C17 C30 C31 C32 C33 C34 C35 C36 C37 C38 C39 C40 C41 C42 C46 C47 C48 C49 C50 L2: SimulationGenericComponent=True
R6 R17 R18 R19 R20 R21 R22 R23 R24 R25 R26 R28 R29 R30 R31 R32: SimulationGenericComponent=True, TC1=0, TC2=0

## Free pads (board coordinates)
  round 3.75 hole 2.5: 2(110,57.5) 2(110,82.5) 2(135,57.5) 2(135,82.5)

## Via types
v1: diameter 0.6, hole 0.3, Top Layer to Bottom Layer, 420 vias

## Nets (pads, with @x,y where several pads share a name; then routed paths per layer and width w, separated by ;. In a path a pad name is that pad's centre, name@x,y a point inside that pad or via, vN(x,y) a via of type N, cw(c..) or ccw(c..) an arc to the next point about the centre after c; other vN are vias at no path point)
1.9V: C10.2 C11.2 C13.2 C50.2 R29.1 R30.2 U2.4 U3.5 | length 69
  Top Layer w0.4: C13.2 100,70.3 100,71.25 100.5,71.75 103.383,71.75 103.95,72.317 ; U3.5 103.95,72.317 ; U2.4 106.333,70.383 C10.2 C11.2 103.95,70.35 103.95,72.317 ; v1(121.3,93.4) 121.3,99.35 123.1,101.15 R30.2 123.762,101.188 R29.1@123.762,104.35 ; v1(123,86) v1(123,91) ; R29.1 123.75,105.05 124.3,105.6 127.05,105.6 127.5,105.15 C50.2
  Bottom Layer w0.4: U2.4 116,72.049 116,79.5 120.4,83.9 122.4,83.9 123,84.5 v1(123,86) ; v1(121.3,93.4) 121.505,93.195 121.505,92.495 v1(123,91)
3V3: C1.1 C2.1 C3.1 C4.1 C5.1 C6.1 C7.1 C12.2 C16.2 C17.2 C18.2 C30.2 C31.2 C32.2 C45.2 C48.2 C49.2 R1.1 R2.2 R6.2 R27.2 U1.13 U1.19 U1.32 U1.48 U1.64 U2.7 U3.1 U4.5 U7.5 U7.8 U9.2 U9.4 U10.4 X2.1 | length 100.9
  Top Layer w0.2: C17.2 109.75,61
  Top Layer w0.4: C18.2 29.883,106.05 30,105.933 v1(30,104.75) 30,103.75 30.224,103.526 U4.5 ; v1(43.405,92.961) 44.061,92.961 C45.2 45.35,93.4 46.25,92.5 U9.2 46.919,91.819 v1(45.953,91.819) ; R27.2 45.478,98.45 46.028,99 v1(46.25,99) ; U9.4 54.15,92.25 v1(56.25,92.25) ; v1(77.5,93.25) 79.05,93.25 C3.1 C7.1 81.45,93.25 U1.13 ; C2.1 v1(85.1,102.65) 86.5,101.25 U1.64 ; U1.19 88.5,87.877 88.8,87.577 C6.1 C4.1 88.75,83.7 v1(88.75,82) ; U1.32 95.293,89.75 v1(95.773,89.271) ; U1.48 97,101 v1(98.8,102.8) C1.1 C5.1 v1(103.75,105) ; v1(102,61) C16.2 C17.2 ; U3.1 103.95,79.15 C12.2 105.25,79.25 105.75,78.75 v1(105.75,77.5) ; v1(106,108.25) R2.2 ; 109.75,61 113.793,65.043 U2.7 ; R1.1 116,100.75 v1(116.75,101.5) 116.75,103.16 X2.1 ; R6.2 C48.2 ; v1(136.8,97.35) 136.775,97.375 134.58,97.375 U10.4 134.55,97.395 C48.2 ; v1(138.8,95.1) 137.1,95.1 C49.2 C48.2
  Bottom Layer w0.4: C32.2 v1(102.552,91.986) C30.2 104.521,92.751 U7.8 ; v1(107.666,90.043) U7.5
3V3_LED: 3.2 R27.1 | length 2.8
  Top Layer w0.4: 3.2 R27.1
5V: C19.2 C26.2 C27.2 C28.2 C44.2 L3.2 R12.2 R15.1 U4.3 U9.3 | length 71.3
  Top Layer w0.3: C19.2 32.061,110.5 33.115,109.446 U4.3 33.115,108.405 v1(33.801,107.719) ; v1(35.744,93.699) 40.976,93.699 C44.2 U9.3 55.925,81.875 L3.2 ; R15.1 42.755,72.252 42.755,73.918 42.893,74.057 44.393,74.057 C26.2 v1@45.15,75.62
  Bottom Layer w0.3: v1(33.801,107.719) 35.744,105.776 v1(35.744,93.699) ; v1(45.15,75.62) 47.4,77.87 52.6,77.87 55.93,81.2 v1(55.93,81.87)
5V_LED: 2.2 R12.1 | length 4.6
  Top Layer w0.2: 64.548,77.948 64.548,80.452
  Top Layer w0.4: R12.1 64.548,77.948 ; 2.2 64.548,80.452
24V: C22.2 C23.1 C25.2 C33.1 C34.1 C35.1 L1.2 R9.2 R11.2 R18.2 U6.9 U8.16 U8.17 U8.20 U8.21 U8.26 | length 20
  Top Layer w0.24: U8.26 C33.1@81.25,74
  Top Layer w0.25: 49.5,68.3 U6.9@49.5,69.6 ; R18.2 78,73.05 81.25,73.05
  Top Layer w0.4: C33.1 v1(83.25,74.9)
  Bottom Layer w0.5: v1(83.25,74.9) 83.25,73.65 84,72.9 85.65,72.9 86.4,72.15 v1(86.4,68.9)
  other v1: 46.6,52 47.6,52 48.6,52 49.6,52 86.4,66.1
24V_HARNESS: D3.2 Q1.3 R5.2 X1.1
24V_LED: 1.2 R9.1 | length 6.2
  Top Layer w0.4: R9.1 56,54 1.2
24V_Unfiltered: C21.2 D2.1 L1.1 Q1.2 R5.1
BOOT0: R4.2 U1.60 | length 8.8
  Top Layer w0.25: R4.2 89.5,108.5 90.25,107.75 90.25,104.25 89.5,103.5 U1.60
BST: C24.2 U6.1 | length 2.5
  Top Layer w0.4: U6.1 51.884,74.466 C24.2
CAN_RX: U1.44 U4.4 | length 80.4
  Top Layer w0.25: v1@30,109 v1(30.026,108.974) U4.4 ; U1.44 98.5,97.25 v1(99.75,96)
  Bottom Layer w0.2: v1(30.026,108.974) 38.102,108.974 45.373,101.703 82.188,101.703 82.376,101.515 94.485,101.515 v1@99.75,96.25
  Bottom Layer w0.25: v1(99.75,96) v1@99.75,96.25
CAN_TX: U1.45 U4.1 | length 74.9
  Top Layer w0.25: U4.1 35.655,110.655 v1(36.25,111.25) ; U1.45 v1(100,97.75)
  Bottom Layer w0.2: v1(36.25,111.25) 45.435,102.065 82.25,102.065 82.5,101.815 95.935,101.815
  Bottom Layer w0.25: 95.935,101.815 v1(100,97.75)
CRIT_CAN_H: R7.2 U4.7 X1.2 | length 35.8
  Top Layer w0.381: X1.2@24.9,77.5 24.9,80.585 25.4,81.085 32.878,81.085 33.75,81.957 33.75,101.48 34.385,102.115 ; U4.7 34.385,102.115 ; R7.2 34.75,101.75 34.385,102.115
CRIT_CAN_L: R8.1 U4.6 X1.3 | length 34.9
  Top Layer w0.381: X1.3@24.9,85.3 24.9,82.22 25.4,81.72 32.615,81.72 33.115,82.22 U4.6 ; R8.1 32.55,100.8 33.115,101.365
Feedback: C26.1 R15.2 R16.1 U6.6 | length 8.5
  Top Layer w0.25: R16.1 45.15,71.2 R15.2 ; C26.1 43.55,73.05 R15.2 ; U6.6 46.566,70.034 R15.2
GND: 1.1 2.1 3.1 C1.2 C2.2 C3.2 C4.2 C5.2 C6.2 C7.2 C8.2 C9.2 C10.1 C11.1 C12.1 C13.1 C14.1 C15.1 C16.1 C17.1 C18.1 C19.1 C20.2 C21.1 C22.1 C23.2 C25.1 C27.1 C28.1 C29.1 C30.1 C31.1 C32.1 C33.2 C34.2 C35.2 C37.2 C38.2 C39.2 C40.2 C41.2 C42.2 C43.1 C44.1 C45.1 C46.2 C47.2 C48.1 C49.1 C50.1 D3.1 J4.2 MH1.1 MH2.1 MH3.1 MH4.1 R3.1 R4.1 R10.1 R13.1 R14.1 R16.2 R19.1 R20.2 R23.2 R26.1 R31.2 U1.12 U1.18 U1.31 U1.47 U1.63 U2.3 U2.8 U3.2 U4.2 U4.8 U6.11 U7.6 U7.7 U7.11 U8.9 U8.11 U8.15 U8.22 U8.23 U8.29 U9.1 U10.2 U10.6 X1.4 X2.3 X2.5 | length 183.2
  Top Layer w0.2: 87.25,71 87.5,70.75
  Top Layer w0.3: 34.385,107.115 U4.2 ; U8.9 U8.29@80.25,65.9
  Top Layer w0.4: C19.1 27.45,108.8 v1(27.5,108.75) ; C20.2 v1(28,102.625) C18.1 ; 34.385,107.115 35.655,105.845 U4.8 ; U4.2 34.443,109.032 34.443,111.443 v1(34.5,111.5) ; 39.324,88.575 C44.1 ; v1(41.75,96.75) 3.1 ; 43.55,67.2 C22.1 ; C45.1 44.5,96.5 45.25,97.25 v1(46.25,97.25) 47.25,97.25 47.6,96.9 U9.1 ; 50.25,81.625 54.625,81.625 ; 51.25,62.79 51.25,63 ; 54.25,70.55 55.05,70.55 55.6,70 v1(55.75,70) ; v1(54.5,87.75) 56.45,87.75 56.5,87.8 ; v1(56.75,74.25) 56.75,75.95 57,76.2 ; 57.35,58.4 v1(57.35,60.1) ; v1(66,58.5) R23.2 ; v1(66.75,73) 68.7,73 R19.1 C42.2 C41.2 ; C39.2 71.7,78.75 v1(73,78.75) 73,76.55 R20.2 ; v1(77.5,61.25) R26.1 ; v1(78,97.25) 79.25,96 C3.2 C7.2 81.95,95.05 83.25,93.75 U1.12 ; C33.2@79.25,74.75 v1(79.25,76.5) ; U8.11 U8.29@81.25,65.9 ; U8.15 83.391,64.109 v1(84.5,63) 85.22,62.28 87.5,62.28 ; U8.22 83.391,69.75 83.25,69.891 U8.23 82.75,70.5 83.25,71 v1(84.75,71) ; C2.2 v1(83.5,107.25) ; R3.1@83.5,110.601 v1(83.5,107.25) ; C40.2 v1(88.75,77) ; R4.1 86.95,106.8 ; C4.2 C6.2 C6.2@87.25,85.8 ; v1@87.418,87.668 87.418,88.003 88,88.585 U1.18 ; U1.63 88,103 v1(87,104) 87,105.7 C9.2 86.95,106.8 ; U1.31 94.5,88.835 95.332,88.003 v1@95.332,87.668 ; v1(95.5,87.835) v1@95.332,87.668 ; C8.2 95.5,85.8 95.5,87.5 v1@95.332,87.668 ; U1.47 99,98.75 99.75,99.5 v1(99.75,101) 101.95,101 102,101.05 C5.2@104,101.05 ; v1(100.75,79.25) C12.1 102.45,77.8 103,77.25 U3.2 ; v1(102,59.25) 103.85,59.25 C16.1 C17.1 ; v1(102,66) 103.95,66 C14.1 C15.1 ; v1(102,68.75) 103.95,68.75 C11.1 C10.1 ; X2.3 X2.5 v1(119.25,105.75) ; R31.2 126.75,94.35 v1(128.3,94.35) ; U10.2 132.078,98.383 132.833,98.383 133.05,98.6 v1(133.05,101.1) 134.05,101.1 134.555,100.595 U10.6 ; C48.1 C49.1 138.6,93.55 v1(138.8,93.35) ; v1(83.5,107.25) 86.5,107.25 86.95,106.8
  Top Layer w0.5: v1(49.3,63.55) C25.1@49.3,64.82
  Top Layer w0.75: 65.326,62.167 65.382,62.224 68.944,62.224 69,62.28 72.75,62.28 ; 65.686,62.167 65.901,61.952 65.901,58.599 v1(66,58.5)
  Top Layer w1: v1(41.5,78.5) 41.511,78.5 42.211,77.8 44.5,77.8 ; 42.8,68.221 43.5,67.521 v1(43.5,67.5) ; v1(46.25,71.75) 46.323,71.75 46.509,71.936 ; U6.11@48.686,71.936 U6.11 ; v1(65.75,85.25) 65.75,85.177 65.861,85.066 65.861,82.268
  Top Layer w1.15: v1(30.25,53.9) 30.25,57.4
  Bottom Layer w0.4: C32.1 v1(102.552,90.386) C30.1 ; v1(105.156,94.249) U7.11 ; v1(106.665,91.44) U7.7 U7.6 ; v1(109.266,90.17) C31.1
  other v1: 22.606,49.2 25.146,49.2 40.411,49.2 42.951,49.2 98.908,49.2 101.448,49.2 103.988,49.2 106.528,49.2 109.068,49.2 111.608,49.2 114.148,49.2 116.713,49.2 119.253,49.2 121.793,49.2 124.333,49.2 126.873,49.2 129.413,49.2 131.953,49.2 134.518,49.2 137.058,49.2 140.132,49.2 142.672,49.2 103.403,51.765 105.41,51.816 124.46,51.816 128.27,51.816 132.08,51.816 18.593,53.188 148.057,53.188 103.403,53.34 72.39,54.915 103.403,54.915 105.41,55.626 113.03,55.626 116.84,55.626 120.65,55.626 124.46,55.626 128.27,55.626 132.08,55.626 139.7,55.626 148.057,55.728 18.593,55.804 72.39,56.464 103.403,56.464 54.127,57.988 55.728,57.988 57.302,57.988 58.903,57.988 103.403,58.039 148.057,58.268 18.593,58.395 113.03,59.436 116.84,59.436 132.08,59.436 139.7,59.436 58.903,59.512 148.057,60.808 18.593,61.011 58.903,61.011 72.39,61.189 58.903,62.509 72.39,62.738 103.403,62.738 109.22,63.246 113.03,63.246 135.89,63.246 139.7,63.246 148.057,63.348 18.593,63.602 41.402,64.008 58.903,64.008 72.39,64.313 41.402,65.507 58.903,65.507 72.39,65.888 148.057,65.888 80.6,66.2 81.5,66.2 82.4,66.2 18.593,66.218 41.402,67.005 58.903,67.005 109.22,67.056 135.89,67.056 139.7,67.056 80.6,67.4 82.4,67.4 148.057,68.428 41.402,68.504 58.903,68.504 80.6,68.6 81.5,68.6 82.4,68.6 41.402,70.002 58.903,70.002 139.7,70.866 148.057,70.968 41.402,71.501 58.903,71.501 48.6,71.85 49.4,71.85 48.6,72.65 49.4,72.65 41.402,73 58.903,73 148.057,73.508 41.402,74.498 58.903,74.498 105.41,74.676 109.22,74.676 135.89,74.676 41.402,75.997 148.057,76.048 109.22,78.486 113.03,78.486 116.84,78.486 128.27,78.486 135.89,78.486 139.7,78.486 148.057,78.588 72.39,80.01 73.939,80.01 75.489,80.01 77.038,80.01 78.588,80.01 80.162,80.01 83.261,80.01 84.811,80.01 86.36,80.01 87.909,80.01 89.459,80.01 91.008,80.01 98.755,80.01 41.402,80.493 148.057,81.128 41.402,81.991 43.002,81.991 44.577,81.991 46.177,81.991 47.752,81.991 49.352,81.991 50.952,81.991 54.127,81.991 57.302,81.991 58.903,81.991 105.41,82.296 113.03,82.296 116.84,82.296 120.65,82.296 124.46,82.296 139.7,82.296 148.057,83.668 105.41,86.106 109.22,86.106 113.03,86.106 116.84,86.106 120.65,86.106 128.27,86.106 135.89,86.106 139.7,86.106 148.057,86.208 87.25,87.835 148.057,88.748 55.88,89.916 59.69,89.916 78.74,89.916 105.41,89.916 113.03,89.916 116.84,89.916 120.65,89.916 124.46,89.916 128.27,89.916 135.89,89.916 139.7,89.916 148.057,91.288 55.88,93.726 59.69,93.726 113.03,93.726 148.057,93.828 148.057,96.368 18.593,97.434 29.21,97.536 36.83,97.536 48.26,97.536 52.07,97.536 55.88,97.536 59.69,97.536 101.6,97.536 105.41,97.536 109.22,97.536 116.84,97.536 124.46,97.536 128.27,97.536 139.7,97.536 148.057,98.908 18.593,100.051 36.83,101.346 40.64,101.346 120.65,101.346 139.7,101.346 148.057,101.448 18.593,102.641 148.057,103.988 40.64,105.156 44.45,105.156 48.26,105.156 52.07,105.156 55.88,105.156 59.69,105.156 63.5,105.156 67.31,105.156 71.12,105.156 74.93,105.156 120.65,105.156 132.08,105.156 135.89,105.156 139.7,105.156 18.593,105.232 148.057,106.528 18.593,107.848 40.64,108.966 44.45,108.966 48.26,108.966 52.07,108.966 55.88,108.966 59.69,108.966 63.5,108.966 67.31,108.966 71.12,108.966 74.93,108.966 90.17,108.966 93.98,108.966 120.65,108.966 124.46,108.966 148.057,109.068 18.593,110.439 148.057,111.608 29.21,112.776 40.64,112.776 44.45,112.776 48.26,112.776 52.07,112.776 55.88,112.776 59.69,112.776 63.5,112.776 67.31,112.776 71.12,112.776 74.93,112.776 109.22,112.776 113.03,112.776 116.84,112.776 120.65,112.776 124.46,112.776 128.27,112.776 132.08,112.776 18.593,113.055 22.606,117.043 25.146,117.043 27.686,117.043 30.226,117.043 32.766,117.043 35.306,117.043 37.871,117.043 40.411,117.043 42.951,117.043 45.491,117.043 48.031,117.043 50.571,117.043 53.111,117.043 55.651,117.043 58.217,117.043 60.757,117.043 63.297,117.043 65.837,117.043 68.377,117.043 70.917,117.043 73.457,117.043 76.022,117.043 78.562,117.043 81.102,117.043 83.642,117.043 86.182,117.043 88.722,117.043 91.262,117.043 93.802,117.043 96.368,117.043 98.908,117.043 101.448,117.043 103.988,117.043 106.528,117.043 109.068,117.043 111.608,117.043 114.148,117.043 116.713,117.043 119.253,117.043 121.793,117.043 124.333,117.043 126.873,117.043 129.413,117.043 131.953,117.043 134.518,117.043 137.058,117.043 140.132,117.043 142.672,117.043
HB_LED: D1.1 R3.2 | length 1.9
  Top Layer w0.4: R3.2@84.85,110.25 D1.1@86.75,110.25
HEART_BEAT: D1.2 U1.57 | length 10.7
  Top Layer w0.254: D1.2@88.667,110.174 90.076,110.174 91,109.25 U1.57
IMU_FSYNC: U1.39 U7.9 | length 9.7
  Top Layer w0.186: U1.39 U1.39@97.138,94.612
  Top Layer w0.2: U1.39@97.138,94.612 v1@99.531,94.612
  Top Layer w0.25: v1@99.531,94.612 v1(99.74,94.402)
  Bottom Layer w0.25: v1(99.74,94.402) 100.892,93.25 U7.9
IMU_INT1: U1.55 U7.4 | length 24.4
  Top Layer w0.25: U1.55 92,102.047 v1(92.414,102.461)
  Bottom Layer w0.25: v1(92.414,102.461) 96.705,102.461 99.007,100.159 104.554,100.159 109.159,95.554 109.159,93.251 108.658,92.75 U7.4
IMU_MISO: U1.35 U7.1 | length 15
  Top Layer w0.2: 107.799,95.868 v1(108.531,95.135)
  Top Layer w0.25: U1.35 97.083,92.833 v1(98.17,92.833) ; v1(99.007,95.135) 99.74,95.135 100.473,95.868 107.799,95.868
  Bottom Layer w0.25: v1(98.17,92.833) 98.17,94.298 v1(99.007,95.135) ; U7.1 108.531,94.486 v1(108.531,95.135)
IMU_MOSI: U1.36 U7.14 | length 16.7
  Top Layer w0.25: v1(95.763,93.146) 96.896,93.146 U1.36 ; v1(99.845,92.623) 106.752,92.623 107.694,93.565 v1(107.694,95.24)
  Bottom Layer w0.25: v1(95.763,93.146) 96.705,92.205 99.426,92.205 v1(99.845,92.623) ; U7.14 107.694,94.418 v1(107.694,95.24)
IMU_NCS: U1.56 U7.12 | length 19.9
  Top Layer w0.25: U1.56 91.5,100.549 92.623,99.426 v1(95.449,99.426) ; v1(101.101,94.716) 101.205,94.821 105.601,94.821 v1(106.857,93.565)
  Bottom Layer w0.2: v1(95.449,99.426) 100.159,94.716 v1(101.101,94.716)
  Bottom Layer w0.25: U7.12 106.665,93.757 v1(106.857,93.565)
IMU_SCLK: U1.29 U7.13 | length 16.6
  Top Layer w0.2: 97.751,91.263 100.473,93.984
  Top Layer w0.25: U1.29 93.5,90.465 94.298,91.263 97.751,91.263 ; 100.473,93.984 v1(104.031,93.984)
  Bottom Layer w0.25: v1(104.031,93.984) 104.973,94.926 106.961,94.926 107.165,94.722 U7.13
INTVCC: C29.2 U6.3 | length 3.1
  Top Layer w0.4: U6.3@49,74.47 49,76.5 C29.2
INTVCC_LED: C40.1 D7.1 R24.2 U8.25 | length 14.2
  Top Layer w0.4: R24.2 82.3,77 C40.1 84.808,76.858 D7.1 84.808,73.273 ; U8.25 81.75,72.6 82.4,73.25 84.81,73.27
LED_BST: C36.1 D7.2 U8.24 | length 13.6
  Top Layer w0.4: U8.24 82.25,71.6 82.65,72 86.682,72 87.19,72.508 D7.2@87.19,74.75 ; D7.2 89.05,74.75 C36.1 D7.2@87.4,74.7
LED_EN_UVLO: R18.1 R20.1 U8.27 | length 11.7
  Top Layer w0.25: R20.1 75.25,76.5 75.725,76.025 75.725,72.925 76.2,72.45 79.8,72.45 80.75,71.5 U8.27
LED_FAULT: R24.1 U1.9 U8.8 | length 56.5
  Top Layer w0.2: v1(76.75,99) 79.25,99 83,95.25
  Top Layer w0.25: v1(77.5,64) 77.5,65 78.25,65.75 U8.8 ; R24.1 79.5,78.3 v1(79.5,81.75) ; 83,95.25 U1.9
  Bottom Layer w0.25: v1(76.75,99) 76.665,98.915 76.665,88.895 79.5,86.06 79.5,79 81,77.5 81,71.6 80.6,71.2 78.9,71.2 78.5,70.8 78.5,65 v1(77.5,64)
LED_FB: R17.1 R19.2 U8.4 | length 15.1
  Top Layer w0.25: R19.2 68.788,71.412 68.788,67.512 69.05,67.25 72.75,67.25 73.25,67.75 U8.4
LED_ISMON: U1.24 U8.7 | length 35.6
  Top Layer w0.25: v1(77.866,66.144) 79.504,66.144 U8.7 ; v1(80.169,77.238) 80.169,78.704 85.82,84.355 85.82,89.274 87.181,90.635 90.844,90.635 91,90.479 U1.24
  Bottom Layer w0.25: v1@77.87,66.14 77.87,71.4 78.27,71.8 79.77,71.8 80.17,72.2 v1(80.169,77.238)
LED_ISN: M1.1 R21.1 U8.6 | length 27.7
  Top Layer w0.2: U8.6@79.61,66.75 77.4,66.75 76.9,66.25 76.9,55.8 77.4,55.3 86.1,55.3 86.6,55.8 86.6,58.23 86.23,58.6
  Top Layer w0.42: M1.1@81.68,59.25 M1.1@82.98,59.25
LED_PWM: R22.1 R23.1 U1.16 | length 44.1
  Top Layer w0.25: R23.1 R22.1 72.2,59.95 72.795,60.545 74.795,60.545 v1(75,60.75) ; v1(82.5,86.25) 82.5,86.5 85.5,89.5 U1.16
  Bottom Layer w0.25: v1(75,60.75) 75.205,60.955 75.636,60.955 76.681,62 ; 76.68,62 79.05,64.37 79.05,70.2 79.45,70.6 82.1,70.6 82.5,71 v1(82.5,86.25)
LED_PWM_U8: R22.2 U8.12 | length 11
  Top Layer w0.25: R22.2 74.223,58.923 v1(75.878,58.923) ; v1(81.32,64.156) 81.75,64.586 U8.12
  Bottom Layer w0.25: v1(75.878,58.923) 76.087,58.923 v1(81.32,64.156)
LED_PWMTG: M1.4 U8.13 | length 6.5
  Top Layer w0.25: M1.4@81.03,59.25 81.03,59.699 81.331,60 81.7,60 82.3,60.6 U8.13@82.3,65
LED_RT: R26.2 U8.10 | length 3.9
  Top Layer w0.25: U8.10 80.75,61.3 R26.2
LED_SS: C41.1 U8.2 | length 6.5
  Top Layer w0.25: C41.1 75.651,71.45 78.351,68.75 U8.2
LED_SW: C36.2 L2.1 U8.18 U8.19 | length 4.3
  Top Layer w0.4: L2.1@90.1,70.5 91,71.4 C36.2
LED_VC: R25.2 U8.3 | length 8.1
  Top Layer w0.25: R25.2@71.534,68.25 U8.3
LED_VC_RC: C42.1 R25.1 | length 1.6
  Top Layer w0.25: R25.1 C42.1
LED_VCC: J4.1 M1.5
LED_VOUT: C37.1 C38.1 C46.1 C47.1 L2.2 R17.2 R21.2 U8.5 U8.14 | length 48.5
  Top Layer w0.2: R17.2 68.1,66.6 76.2,66.6 76.4,66.4 ; U8.5@79.61,67.25 77.193,67.25 76.4,66.457 76.4,55.593 77.193,54.8 86.307,54.8 87.1,55.593 87.1,57.92 R21.2@87.78,58.6 ; U8.14 82.75,61 83.35,60.4 88.2,60.4
LED_VREF: C39.1 U8.1 U8.28 | length 13.9
  Top Layer w0.25: C39.1 70.75,75.5 71.691,74.559 74.691,74.559 75.25,74 75.25,72.5 78.5,69.25 U8.1 U8.28
LEDP_CMP_OUT: R28.2 R32.1 U10.5 | length 15.3
  Top Layer w0.25: R32.1 126.575,101.175 129.182,101.175 129.308,101.301 129.308,101.858 129.55,102.1 135.05,102.1 136.55,100.6 136.55,98.85 136.05,98.35 U10.5
LEDP_CMP_REF: R30.1 R31.1 R32.2 U10.3 | length 12.7
  Top Layer w0.25: R30.1 R32.2 126.55,96.1 131.55,96.1 132.045,96.595 U10.3
LEDP_SENSE: R29.2 U2.15 U10.1 | length 41.2
  Top Layer w0.25: R29.2 125.35,103.3 125.8,102.85 130.76,102.85 131.26,103.35 v1(131.55,103.35) ; U2.15 130.001,74.688 130.001,79.715 v1(130.085,80.75) ; v1(131.3,100.85) 131.3,100.77 131.838,100.232 131.838,99.49 132.028,99.3 U10.1
  Bottom Layer w0.25: v1(130.085,80.75) 130.001,80.834 130.001,95.501 131.3,96.8 v1(131.3,100.85) 131.55,101.1 v1(131.55,103.35)
NRST: R2.1 U1.7 X2.10 | length 59.1
  Top Layer w0.2: 78.25,100.424 82.424,96.25 U1.7
  Top Layer w0.25: 78.25,100.424 78.25,111.5 79.75,113 107.75,113 109.3,111.45 R2.1 112.76,108.25 X2.10
OFS_LDO_EN: U1.28 U3.3 | length 18.1
  Top Layer w0.25: U1.28 93,86.802 92.95,86.752 92.95,84.3 101.475,75.775 U3.3
OFS_LED_PULSE: R28.1 U1.14 U1.15 | length 63.5
  Top Layer w0.25: v1(82.25,89.75) 82.25,91.25 83.25,92.25 U1.15 U1.14 ; R28.1 129.3,99.507 v1(129.3,97.85)
  Bottom Layer w0.2: 83.25,88.75 128.5,88.75
  Bottom Layer w0.25: v1(82.25,89.75) 83.25,88.75 ; 128.5,88.75 129.3,89.55 v1(129.3,97.85)
OFS_MISO: R6.1 U1.52 U2.12 | length 77.4
  Top Layer w0.2: U1.52 93.5,104.75 95.5,106.75 104.05,106.75 119.5,91.3
  Top Layer w0.25: 119.5,91.3 121.2,91.3 123.05,93.15 128.281,93.15 128.681,93.55 R6.1 132,93.35 132,71.347 U2.12
OFS_MOSI: U1.53 U2.11 | length 106
  Top Layer w0.2: 93,104.674 95.376,107.05 104.45,107.05 ; 116.55,98.75 126.24,108.44 139.06,108.44 140.5,107 140.5,78.067 U2.11
  Top Layer w0.25: U1.53 93,104.674 ; 104.45,107.05 112.75,98.75 116.55,98.75
OFS_MOTION: U1.26 U2.9 | length 58.2
  Top Layer w0.2: 127.056,60.493 U2.9@128.366,61.803
  Top Layer w0.25: v1(91.472,86.448) 91.472,87.39 92,87.918 U1.26 ; v1(107.38,60.493) 127.056,60.493 ; U2.9@128.366,61.803 U2.9
  Bottom Layer w0.25: v1(91.472,86.448) 91.472,81.425 107.38,65.517 v1(107.38,60.493)
OFS_NCS: U1.4 U2.13 | length 77.1
  Top Layer w0.25: v1(81.5,98.5) 82.25,97.75 U1.4
  Bottom Layer w0.25: v1(81.5,98.5) 81.415,98.415 81.415,89.404 83.819,87 124,87 129.25,81.75 129.25,70.377 U2.13
OFS_NRESET: U1.27 U2.14 | length 65.1
  Top Layer w0.2: 130.671,81.344 cw(c130.085,80.75) 130.69,81.325
  Top Layer w0.25: U1.27 92.5,87.5 92,87 92,82.75 v1(96.25,78.5) ; v1(96.25,82.25) 96.455,82.455 96.857,82.455 99.152,84.75 127.219,84.75 130.671,81.344 ; U2.14 131,73.907 131,81 130.69,81.325
  Bottom Layer w0.25: v1(96.25,78.5) v1(96.25,82.25)
OFS_SCLK: U1.51 U2.10 | length 109.3
  Top Layer w0.2: 103.512,109 112.812,99.7 117.076,99.7 126.116,108.74 139.184,108.74 140.8,107.124 140.8,76.587
  Top Layer w0.25: U1.51 94,103.25 95.5,104.75 v1(97.25,104.75) ; v1(98.5,109) 103.512,109 ; U2.10 140.8,76.587
  Bottom Layer w0.25: v1(97.25,104.75) 98.5,106 v1(98.5,109)
PAW_VDDREG: C14.2 C15.2 U2.5 | length 15.4
  Top Layer w0.4: C14.2 C15.2 107.7,64.45 111.853,68.603 U2.5
PP_Gate: D2.2 Q1.1 R10.2 | length 5.6
  Top Layer w0.25: R10.2 D2.2 35.45,62.625 Q1.1
RT: R14.2 U6.4 | length 2.8
  Top Layer w0.25: R14.2 48.5,76.6 U6.4
SPLIT: C20.1 R7.1 R8.2 | length 12
  Top Layer w0.254: C20.1 R8.2 v1(31.5,96.75) ; R7.1 35,98.95 v1(35,96.75)
  Bottom Layer w0.254: v1(31.5,96.75) v1(35,96.75)
SW: C24.1 L3.1 U6.2 | length 2.1
  Top Layer w0.25: U6.2@49.5,74.9 49.5,75.7
  Top Layer w1: L3.1@52.08,76.5 L3.1@52.08,77.8
SWCLK: U1.49 X2.4 | length 21.4
  Top Layer w0.25: U1.49 95,102.25 96.665,103.915 100.165,103.915 v1(102,105.75) ; v1(108.5,106.5) 108.568,106.432 109.318,106.432 111.27,104.48 X2.4
  Bottom Layer w0.25: v1(102,105.75) 102.75,106.5 v1(108.5,106.5)
SWDIO: R1.2 U1.46 X2.2 | length 21.7
  Top Layer w0.25: U1.46 99.319,98.25 101.069,100 104.75,100 v1(106.5,101.75) ; v1(109.5,104.75) 111.04,103.21 X2.2 112.95,103.06 R1.2
  Bottom Layer w0.25: v1(106.5,101.75) v1(109.5,104.75)
TR: C43.2 U6.7 | length 4.7
  Top Layer w0.25: C43.2 46.923,67.75 48.5,69.327 U6.7
UV: R11.1 R13.2 U6.10 | length 10.7
  Top Layer w0.3: 52.853,63.423 52.853,67.181
  Top Layer w0.4: U6.10 52.853,67.181 ; R11.1 R13.2 52.129,62.7 52.853,63.423
VCAP_1: C8.1 U1.30 | length 4
  Top Layer w0.4: C8.1 94,85.8 U1.30
VCAP_2: C9.1 U1.62 | length 4.5
  Top Layer w0.4: U1.62 88.5,105.7 C9.1
pads on no net: U1.1 U1.2 U1.3 U1.5 U1.6 U1.8 U1.10 U1.11 U1.17 U1.20 U1.21 U1.22 U1.23 U1.25 U1.33 U1.34 U1.37 U1.38 U1.40 U1.41 U1.42 U1.43 U1.50 U1.54 U1.58 U1.59 U1.61 U2.1 U2.2 U2.6 U2.16 U3.4 U6.5 U6.8 U7.2 U7.3 U7.10 X1.None X2.6 X2.7 X2.8 X2.9

## Polygon pours and split planes (outlines as drawn)
GND on Top Layer "Top Layer-GND" (solid, remove dead copper, pour order 25): 22.4,48 144.25,48 ccw(c144.25,53) 149.25,53 149.25,113.25 ccw(c144.25,113.25) 144.25,118.25 22.4,118.25 ccw(c22.4,113.25) 17.4,113.25 17.4,53 ccw(c22.4,53)
5V on Top Layer "PWR_5V" (solid, pour order 8): 55,79.35 63.2,79.35 63.2,78.25 64.45,78.25 64.45,80.4 55,80.4
24V_HARNESS on Top Layer "PWR_24V_HARNESS2" (solid, remove dead copper, pour order 24): 27.3,75.4 38.2,75.4 38.2,78.3 27.3,78.3
LED_SW on Top Layer "PWR_LED_SW" (solid, pour order 9): 83.35,66.95 87.7,66.95 87.7,64 90.45,64 90.45,71 87.7,71 87.7,68.1 83.35,68.1
24V on Top Layer "PWR_LED_VIN_A" (solid, pour order 12): 83.3,65.55 86.8,65.55 86.8,66.7 83.3,66.7
LED_VCC on Top Layer "PWR_LED_VCC" (solid, remove dead copper, pour order 18): 77.8,55.75 83.35,55.75 83.35,58.6 77.8,58.6
LED_ISN on Top Layer "PWR_LED_ISNS" (solid, pour order 11): 82.65,58.35 86.45,58.35 86.45,60.2 82.65,60.2
SW on Top Layer "PWR_BUCK_SW" (solid, pour order 7): 49.4,75.42 53.15,75.42 53.15,73.3 54.55,73.3 54.55,77.1 51.25,77.1 51.25,76.05 49.4,76.05
24V on Top Layer "PWR_LED_VIN_B" (solid, pour order 13): 83.3,68.15 86.8,68.15 86.8,69.45 83.3,69.45
LED_VOUT on Top Layer "PWR_LED_VOUT" (solid, pour order 10): 87.6,57.6 89.95,57.6 89.95,59.85 99.5,59.85 99.5,54.6 93,54.6 93,50.9 102,50.9 102,65.6 96.3,65.6 96.3,63.6 87.6,63.6
24V on Top Layer "PWR_24V_IN" (solid, pour order 6): 35.4,51.2 52.7,51.2 52.7,59.9 48.35,59.9 48.35,66.55 50.1,66.55 50.1,68.6 46.05,68.6 46.05,65.2 44.05,65.2 44.05,59.05 35.4,59.05